# Altium PCB NB3000XN.PcbDoc (part 69 of 71)
Units mil, origin at the board's own origin, x right, y up, seen from the top; angles counter-clockwise.
Board outline 9527.56 x 6929.77 mil, 6 copper layers (Top Layer, GND+SHIELD, MidLayer1, MidLayer2, P2 - 3V3+5V0, Bottom Layer), stack 62.375 mil thick; 832 components, 1027 nets, 4655 pads, 4981 vias.
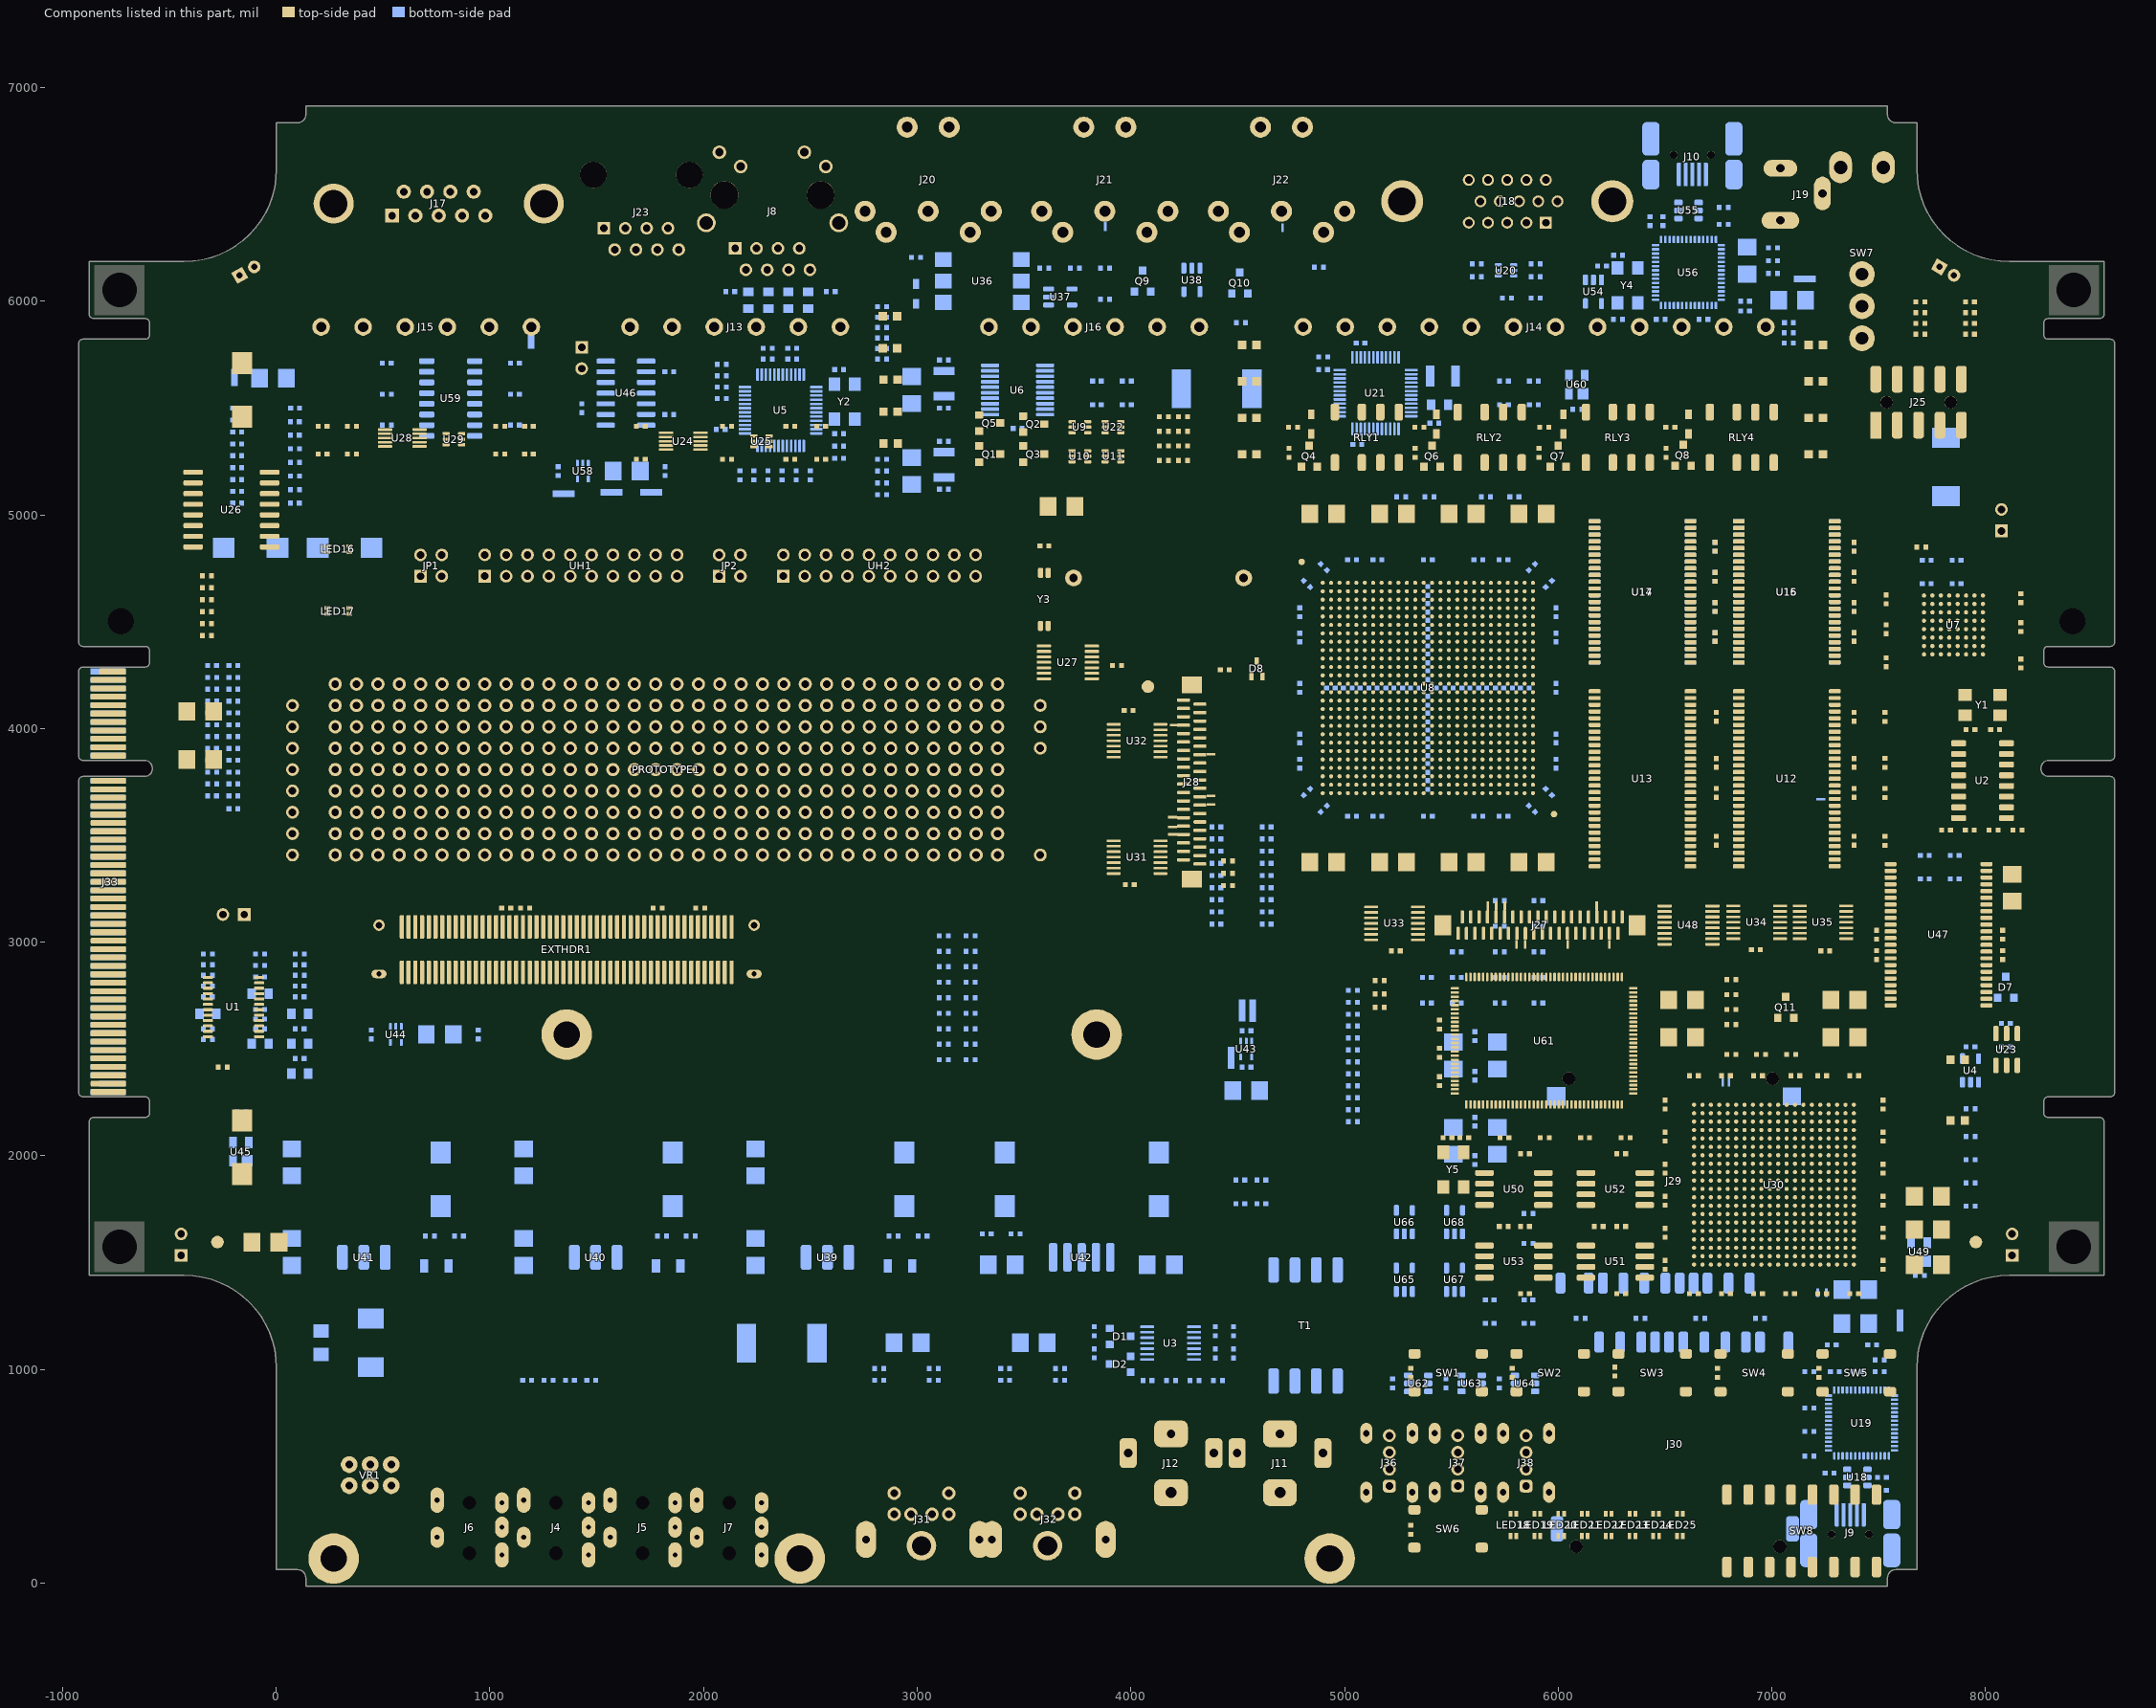
[diagram p73: the components of this part, seen from the top]

## Via types
v1: diameter 23, hole 11.81, Top Layer to Bottom Layer, 3672 vias
v2: diameter 26, hole 11.81, Top Layer to Bottom Layer, 461 vias
v3: diameter 19, hole 11.81, Top Layer to Bottom Layer, tented both sides, 396 vias
v4: diameter 23.62, hole 11.81, Top Layer to Bottom Layer, 288 vias
v5: diameter 20, hole 11.81, Top Layer to Bottom Layer, 91 vias
v6: diameter 23, hole 11.81, Top Layer to Bottom Layer, tented both sides, 50 vias
v7: diameter 31, hole 11.81, Top Layer to Bottom Layer, 15 vias
v8: diameter 27.56, hole 11.81, Top Layer to Bottom Layer, tented both sides, 4 vias
v9: diameter 29, hole 11.81, Top Layer to Bottom Layer, 3 vias
v10: diameter 21, hole 11.81, Top Layer to Bottom Layer, 1 vias

## Nets (pads, with @x,y where several pads share a name; then routed paths per layer and width w, separated by ;. In a path a pad name is that pad's centre, name@x,y a point inside that pad or via, vN(x,y) a via of type N, cw(c..) or ccw(c..) an arc to the next point about the centre after c; other vN are vias at no path point) (continued)
copper on no net: (continued)
  Top Layer w8: v2(6773.78,1550.04) 6793.46,1569.72 ; v2@6773.78,1559.04 ccw(c6773.78,1580.77) 6789.14,1565.4 ccw(c6804.51,1550.04) v2@6782.78,1550.04 ; v2(6773.78,1825.63) 6793.46,1845.31 ; v2@6773.78,1834.63 ccw(c6773.78,1856.36) 6789.14,1840.99 ccw(c6804.51,1825.63) v2@6782.78,1825.63 ; 6787.62,1569.72 cw(c6773.52,1569.72) 6783.49,1559.75 cw(c6793.46,1549.78) 6793.46,1563.88 ; 6787.62,1845.31 cw(c6773.52,1845.31) 6783.49,1835.34 cw(c6793.46,1825.37) 6793.46,1839.47 ; v2(6813.15,1471.3) 6832.83,1490.98 ; v2@6813.15,1480.3 ccw(c6813.15,1502.03) 6828.51,1486.66 ccw(c6843.88,1471.3) v2@6822.15,1471.3 ; v2(6813.15,1510.67) 6832.83,1530.35 ; v2@6813.15,1519.67 ccw(c6813.15,1541.4) 6828.51,1526.03 ccw(c6843.88,1510.67) v2@6822.15,1510.67 ; v2(6813.15,1550.04) 6832.83,1569.72 ; v2@6813.15,1559.04 ccw(c6813.15,1580.77) 6828.51,1565.4 ccw(c6843.88,1550.04) v2@6822.15,1550.04 ; v2(6813.15,1589.41) 6832.83,1609.09 ; v2@6813.15,1598.41 ccw(c6813.15,1620.14) 6828.51,1604.77 ccw(c6843.88,1589.41) v2@6822.15,1589.41 ; v2(6813.15,1628.78) 6832.83,1648.46 ; v2@6813.15,1637.78 ccw(c6813.15,1659.51) 6828.51,1644.14 ccw(c6843.88,1628.78) v2@6822.15,1628.78 ; v2(6813.15,1707.52) 6832.83,1727.2 ; v2@6813.15,1716.52 ccw(c6813.15,1738.25) 6828.51,1722.88 ccw(c6843.88,1707.52) v2@6822.15,1707.52 ; v2@6813.15,1895.37 cw(c6813.15,1873.64) 6828.51,1889.01 cw(c6843.88,1904.37) v2@6822.15,1904.37 ; v2(6813.15,1904.37) 6832.83,1884.68 ; v2@6813.15,1974.11 cw(c6813.15,1952.38) 6828.51,1967.75 cw(c6843.88,1983.11) v2@6822.15,1983.11 ; v2(6813.15,1983.11) 6832.83,1963.43 ; 6826.99,1490.98 cw(c6812.89,1490.98) 6822.86,1481.01 cw(c6832.83,1471.04) 6832.83,1485.14 ; 6826.99,1530.35 cw(c6812.89,1530.35) 6822.86,1520.38 cw(c6832.83,1510.41) 6832.83,1524.51 ; 6826.99,1569.72 cw(c6812.89,1569.72) 6822.86,1559.75 cw(c6832.83,1549.78) 6832.83,1563.88 ; 6826.99,1609.09 cw(c6812.89,1609.09) 6822.86,1599.12 cw(c6832.83,1589.15) 6832.83,1603.25 ; 6826.99,1648.46 cw(c6812.89,1648.46) 6822.86,1638.49 cw(c6832.83,1628.52) 6832.83,1642.62 ; 6826.99,1727.2 cw(c6812.89,1727.2) 6822.86,1717.23 cw(c6832.83,1707.26) 6832.83,1721.36 ; 6826.99,1884.68 ccw(c6812.89,1884.68) 6822.86,1894.66 ccw(c6832.83,1904.63) 6832.83,1890.53 ; 6826.99,1963.43 ccw(c6812.89,1963.43) 6822.86,1973.4 ccw(c6832.83,1983.37) 6832.83,1969.27 ; v2(6852.52,1550.04) 6872.2,1569.72 ; v2@6852.52,1559.04 ccw(c6852.52,1580.77) 6867.88,1565.4 ccw(c6883.25,1550.04) v2@6861.52,1550.04 ; v2(6852.52,1589.41) 6872.2,1609.09 ; v2@6852.52,1598.41 ccw(c6852.52,1620.14) 6867.88,1604.77 ccw(c6883.25,1589.41) v2@6861.52,1589.41 ; v2(6852.52,1628.78) 6872.2,1648.46 ; v2@6852.52,1637.78 ccw(c6852.52,1659.51) 6867.88,1644.14 ccw(c6883.25,1628.78) v2@6861.52,1628.78 ; v2(6852.52,1668.15) 6872.2,1687.83 ; v2@6852.52,1677.15 ccw(c6852.52,1698.88) 6867.88,1683.51 ccw(c6883.25,1668.15) v2@6861.52,1668.15 ; v2(6852.52,1707.52) 6872.2,1727.2 ; v2@6852.52,1716.52 ccw(c6852.52,1738.25) 6867.88,1722.88 ccw(c6883.25,1707.52) v2@6861.52,1707.52 ; v2(6852.52,1746.89) 6872.2,1766.57 ; v2@6852.52,1755.89 ccw(c6852.52,1777.62) 6867.88,1762.25 ccw(c6883.25,1746.89) v2@6861.52,1746.89 ; v2(6852.52,1786.26) 6872.2,1805.94 ; v2@6852.52,1795.26 ccw(c6852.52,1816.99) 6867.88,1801.62 ccw(c6883.25,1786.26) v2@6861.52,1786.26 ; v2(6852.52,1825.63) 6872.2,1845.31 ; v2@6852.52,1834.63 ccw(c6852.52,1856.36) 6867.88,1840.99 ccw(c6883.25,1825.63) v2@6861.52,1825.63 ; v2@6852.52,1895.37 cw(c6852.52,1873.64) 6867.88,1889.01 cw(c6883.25,1904.37) v2@6861.52,1904.37 ; v2(6852.52,1904.37) 6872.2,1884.68 ; v2@6852.52,1934.74 cw(c6852.52,1913.01) 6867.88,1928.38 cw(c6883.25,1943.74) v2@6861.52,1943.74 ; v2(6852.52,1943.74) 6872.2,1924.06 ; v2@6852.52,1974.11 cw(c6852.52,1952.38) 6867.88,1967.75 cw(c6883.25,1983.11) v2@6861.52,1983.11 ; v2(6852.52,1983.11) 6872.2,1963.43 ; v2@6852.52,2013.48 cw(c6852.52,1991.75) 6867.88,2007.12 cw(c6883.25,2022.48) v2@6861.52,2022.48 ; v2(6852.52,2022.48) 6872.2,2002.8 ; v2@6852.52,2052.85 cw(c6852.52,2031.12) 6867.88,2046.49 cw(c6883.25,2061.85) v2@6861.52,2061.85 ; v2(6852.52,2061.85) 6872.2,2042.17 ; v2@6852.52,2092.22 cw(c6852.52,2070.49) 6867.88,2085.86 cw(c6883.25,2101.22) v2@6861.52,2101.22 ; v2(6852.52,2101.22) 6872.2,2081.54 ; 6866.36,1569.72 cw(c6852.26,1569.72) 6862.23,1559.75 cw(c6872.2,1549.78) 6872.2,1563.88 ; 6866.36,1609.09 cw(c6852.26,1609.09) 6862.23,1599.12 cw(c6872.2,1589.15) 6872.2,1603.25 ; 6866.36,1648.46 cw(c6852.26,1648.46) 6862.23,1638.49 cw(c6872.2,1628.52) 6872.2,1642.62 ; 6866.36,1687.83 cw(c6852.26,1687.83) 6862.23,1677.86 cw(c6872.2,1667.89) 6872.2,1681.99 ; 6866.36,1727.2 cw(c6852.26,1727.2) 6862.23,1717.23 cw(c6872.2,1707.26) 6872.2,1721.36 ; 6866.36,1766.57 cw(c6852.26,1766.57) 6862.23,1756.6 cw(c6872.2,1746.63) 6872.2,1760.73 ; 6866.36,1805.94 cw(c6852.26,1805.94) 6862.23,1795.97 cw(c6872.2,1786) 6872.2,1800.1 ; 6866.36,1845.31 cw(c6852.26,1845.31) 6862.23,1835.34 cw(c6872.2,1825.37) 6872.2,1839.47 ; 6866.36,1884.68 ccw(c6852.26,1884.68) 6862.23,1894.66 ccw(c6872.2,1904.63) 6872.2,1890.53 ; 6866.36,1924.06 ccw(c6852.26,1924.06) 6862.23,1934.03 ccw(c6872.2,1944) 6872.2,1929.9 ; 6866.36,1963.43 ccw(c6852.26,1963.43) 6862.23,1973.4 ccw(c6872.2,1983.37) 6872.2,1969.27 ; 6866.36,2002.8 ccw(c6852.26,2002.8) 6862.23,2012.77 ccw(c6872.2,2022.74) 6872.2,2008.64 ; 6866.36,2042.17 ccw(c6852.26,2042.17) 6862.23,2052.14 ccw(c6872.2,2062.11) 6872.2,2048.01 ; 6866.36,2081.54 ccw(c6852.26,2081.54) 6862.23,2091.51 ccw(c6872.2,2101.48) 6872.2,2087.38 ; v2(6891.89,1510.67) 6911.57,1530.35 ; v2@6891.89,1519.67 ccw(c6891.89,1541.4) 6907.25,1526.03 ccw(c6922.62,1510.67) v2@6900.89,1510.67 ; v2(6891.89,1550.04) 6911.57,1569.72 ; v2@6891.89,1559.04 ccw(c6891.89,1580.77) 6907.25,1565.4 ccw(c6922.62,1550.04) v2@6900.89,1550.04 ; v2(6891.89,1589.41) 6911.57,1609.09 ; v2@6891.89,1598.41 ccw(c6891.89,1620.14) 6907.25,1604.77 ccw(c6922.62,1589.41) v2@6900.89,1589.41 ; v2(6891.89,1668.15) 6911.57,1687.83 ; v2@6891.89,1677.15 ccw(c6891.89,1698.88) 6907.25,1683.51 ccw(c6922.62,1668.15) v2@6900.89,1668.15 ; v2(6891.89,1707.52) 6911.57,1727.2 ; v2@6891.89,1716.52 ccw(c6891.89,1738.25) 6907.25,1722.88 ccw(c6922.62,1707.52) v2@6900.89,1707.52 ; v2(6891.89,1786.26) 6911.57,1805.94 ; v2@6891.89,1795.26 ccw(c6891.89,1816.99) 6907.25,1801.62 ccw(c6922.62,1786.26) v2@6900.89,1786.26 ; v2@6891.89,1934.74 cw(c6891.89,1913.01) 6907.25,1928.38 cw(c6922.62,1943.74) v2@6900.89,1943.74 ; v2(6891.89,1943.74) 6911.57,1924.06 ; v2@6891.89,2013.48 cw(c6891.89,1991.75) 6907.25,2007.12 cw(c6922.62,2022.48) v2@6900.89,2022.48 ; v2(6891.89,2022.48) 6911.57,2002.8 ; v2@6891.89,2052.85 cw(c6891.89,2031.12) 6907.25,2046.49 cw(c6922.62,2061.85) v2@6900.89,2061.85 ; v2(6891.89,2061.85) 6911.57,2042.17 ; 6905.73,1530.35 cw(c6891.63,1530.35) 6901.6,1520.38 cw(c6911.57,1510.41) 6911.57,1524.51 ; 6905.73,1569.72 cw(c6891.63,1569.72) 6901.6,1559.75 cw(c6911.57,1549.78) 6911.57,1563.88 ; 6905.73,1609.09 cw(c6891.63,1609.09) 6901.6,1599.12 cw(c6911.57,1589.15) 6911.57,1603.25 ; 6905.73,1687.83 cw(c6891.63,1687.83) 6901.6,1677.86 cw(c6911.57,1667.89) 6911.57,1681.99 ; 6905.73,1727.2 cw(c6891.63,1727.2) 6901.6,1717.23 cw(c6911.57,1707.26) 6911.57,1721.36 ; 6905.73,1805.94 cw(c6891.63,1805.94) 6901.6,1795.97 cw(c6911.57,1786) 6911.57,1800.1 ; 6905.73,1924.06 ccw(c6891.63,1924.06) 6901.6,1934.03 ccw(c6911.57,1944) 6911.57,1929.9 ; 6905.73,2002.8 ccw(c6891.63,2002.8) 6901.6,2012.77 ccw(c6911.57,2022.74) 6911.57,2008.64 ; 6905.73,2042.17 ccw(c6891.63,2042.17) 6901.6,2052.14 ccw(c6911.57,2062.11) 6911.57,2048.01 ; v2(6931.26,1471.3) 6950.94,1490.98 ; v2@6931.26,1480.3 ccw(c6931.26,1502.03) 6946.62,1486.66 ccw(c6961.99,1471.3) v2@6940.26,1471.3 ; v2(6931.26,1510.67) 6950.94,1530.35 ; v2@6931.26,1519.67 ccw(c6931.26,1541.4) 6946.62,1526.03 ccw(c6961.99,1510.67) v2@6940.26,1510.67 ; v2(6931.26,1550.04) 6950.94,1569.72 ; v2@6931.26,1559.04 ccw(c6931.26,1580.77) 6946.62,1565.4 ccw(c6961.99,1550.04) v2@6940.26,1550.04 ; v2(6931.26,1589.41) 6950.94,1609.09 ; v2@6931.26,1598.41 ccw(c6931.26,1620.14) 6946.62,1604.77 ccw(c6961.99,1589.41) v2@6940.26,1589.41 ; v2(6931.26,1628.78) 6950.94,1648.46 ; v2@6931.26,1637.78 ccw(c6931.26,1659.51) 6946.62,1644.14 ccw(c6961.99,1628.78) v2@6940.26,1628.78 ; v2(6931.26,1668.15) 6950.94,1687.83 ; v2@6931.26,1677.15 ccw(c6931.26,1698.88) 6946.62,1683.51 ccw(c6961.99,1668.15) v2@6940.26,1668.15 ; v2(6931.26,1707.52) 6950.94,1727.2 ; v2@6931.26,1716.52 ccw(c6931.26,1738.25) 6946.62,1722.88 ccw(c6961.99,1707.52) v2@6940.26,1707.52 ; v2(6931.26,1746.89) 6950.94,1766.57 ; v2@6931.26,1755.89 ccw(c6931.26,1777.62) 6946.62,1762.25 ccw(c6961.99,1746.89) v2@6940.26,1746.89 ; v2@6931.26,1974.11 cw(c6931.26,1952.38) 6946.62,1967.75 cw(c6961.99,1983.11) v2@6940.26,1983.11 ; v2(6931.26,1983.11) 6950.94,1963.43 ; v2@6931.26,2013.48 cw(c6931.26,1991.75) 6946.62,2007.12 cw(c6961.99,2022.48) v2@6940.26,2022.48 ; v2(6931.26,2022.48) 6950.94,2002.8 ; v2@6931.26,2052.85 cw(c6931.26,2031.12) 6946.62,2046.49 cw(c6961.99,2061.85) v2@6940.26,2061.85 ; v2(6931.26,2061.85) 6950.94,2042.17 ; 6945.1,1490.98 cw(c6931,1490.98) 6940.97,1481.01 cw(c6950.94,1471.04) 6950.94,1485.14 ; 6945.1,1530.35 cw(c6931,1530.35) 6940.97,1520.38 cw(c6950.94,1510.41) 6950.94,1524.51 ; 6945.1,1569.72 cw(c6931,1569.72) 6940.97,1559.75 cw(c6950.94,1549.78) 6950.94,1563.88 ; 6945.1,1609.09 cw(c6931,1609.09) 6940.97,1599.12 cw(c6950.94,1589.15) 6950.94,1603.25 ; 6945.1,1648.46 cw(c6931,1648.46) 6940.97,1638.49 cw(c6950.94,1628.52) 6950.94,1642.62 ; 6945.1,1687.83 cw(c6931,1687.83) 6940.97,1677.86 cw(c6950.94,1667.89) 6950.94,1681.99 ; 6945.1,1727.2 cw(c6931,1727.2) 6940.97,1717.23 cw(c6950.94,1707.26) 6950.94,1721.36 ; 6945.1,1766.57 cw(c6931,1766.57) 6940.97,1756.6 cw(c6950.94,1746.63) 6950.94,1760.73 ; 6945.1,1963.43 ccw(c6931,1963.43) 6940.97,1973.4 ccw(c6950.94,1983.37) 6950.94,1969.27 ; 6945.1,2002.8 ccw(c6931,2002.8) 6940.97,2012.77 ccw(c6950.94,2022.74) 6950.94,2008.64 ; 6945.1,2042.17 ccw(c6931,2042.17) 6940.97,2052.14 ccw(c6950.94,2062.11) 6950.94,2048.01 ; v2(6970.63,1510.67) 6990.31,1530.35 ; v2@6970.63,1519.67 ccw(c6970.63,1541.4) 6985.99,1526.03 ccw(c7001.36,1510.67) v2@6979.63,1510.67 ; v2(6970.63,1550.04) 6990.31,1569.72 ; v2@6970.63,1559.04 ccw(c6970.63,1580.77) 6985.99,1565.4 ccw(c7001.36,1550.04) v2@6979.63,1550.04 ; v2(6970.63,1589.41) 6990.31,1609.09 ; v2@6970.63,1598.41 ccw(c6970.63,1620.14) 6985.99,1604.77 ccw(c7001.36,1589.41) v2@6979.63,1589.41 ; v2(6970.63,1628.78) 6990.31,1648.46 ; v2@6970.63,1637.78 ccw(c6970.63,1659.51) 6985.99,1644.14 ccw(c7001.36,1628.78) v2@6979.63,1628.78 ; v2(6970.63,1668.15) 6990.31,1687.83 ; v2@6970.63,1677.15 ccw(c6970.63,1698.88) 6985.99,1683.51 ccw(c7001.36,1668.15) v2@6979.63,1668.15 ; v2(6970.63,1707.52) 6990.31,1727.2 ; v2@6970.63,1716.52 ccw(c6970.63,1738.25) 6985.99,1722.88 ccw(c7001.36,1707.52) v2@6979.63,1707.52 ; v2(6970.63,1746.89) 6990.31,1766.57 ; v2@6970.63,1755.89 ccw(c6970.63,1777.62) 6985.99,1762.25 ccw(c7001.36,1746.89) v2@6979.63,1746.89 ; v2@6970.63,2013.48 cw(c6970.63,1991.75) 6985.99,2007.12 cw(c7001.36,2022.48) v2@6979.63,2022.48 ; v2(6970.63,2022.48) 6990.31,2002.8 ; v2@6970.63,2052.85 cw(c6970.63,2031.12) 6985.99,2046.49 cw(c7001.36,2061.85) v2@6979.63,2061.85 ; v2(6970.63,2061.85) 6990.31,2042.17 ; 6984.47,1530.35 cw(c6970.37,1530.35) 6980.34,1520.38 cw(c6990.31,1510.41) 6990.31,1524.51 ; 6984.47,1569.72 cw(c6970.37,1569.72) 6980.34,1559.75 cw(c6990.31,1549.78) 6990.31,1563.88 ; 6984.47,1609.09 cw(c6970.37,1609.09) 6980.34,1599.12 cw(c6990.31,1589.15) 6990.31,1603.25 ; 6984.47,1648.46 cw(c6970.37,1648.46) 6980.34,1638.49 cw(c6990.31,1628.52) 6990.31,1642.62 ; 6984.47,1687.83 cw(c6970.37,1687.83) 6980.34,1677.86 cw(c6990.31,1667.89) 6990.31,1681.99 ; 6984.47,1727.2 cw(c6970.37,1727.2) 6980.34,1717.23 cw(c6990.31,1707.26) 6990.31,1721.36 ; 6984.47,1766.57 cw(c6970.37,1766.57) 6980.34,1756.6 cw(c6990.31,1746.63) 6990.31,1760.73 ; 6984.47,2002.8 ccw(c6970.37,2002.8) 6980.34,2012.77 ccw(c6990.31,2022.74) 6990.31,2008.64 ; 6984.47,2042.17 ccw(c6970.37,2042.17) 6980.34,2052.14 ccw(c6990.31,2062.11) 6990.31,2048.01 ; 7029.69,1485.14 cw(c7029.69,1471.04) 7039.66,1481.01 cw(c7049.63,1490.98) 7035.53,1490.98 ; 7029.69,1490.98 v2(7049.37,1471.3) ; 7029.69,1563.88 cw(c7029.69,1549.78) 7039.66,1559.75 cw(c7049.63,1569.72) 7035.53,1569.72 ; 7029.69,1569.72 v2(7049.37,1550.04) ; 7029.69,1642.62 cw(c7029.69,1628.52) 7039.66,1638.49 cw(c7049.63,1648.46) 7035.53,1648.46 ; 7029.69,1648.46 v2(7049.37,1628.78) ; 7029.69,1681.99 cw(c7029.69,1667.89) 7039.66,1677.86 cw(c7049.63,1687.83) 7035.53,1687.83 ; 7029.69,1687.83 v2(7049.37,1668.15) ; 7029.69,1721.36 cw(c7029.69,1707.26) 7039.66,1717.23 cw(c7049.63,1727.2) 7035.53,1727.2 ; 7029.69,1727.2 v2(7049.37,1707.52) ; 7029.69,1963.43 v2(7049.37,1983.11) ; 7029.69,1969.27 ccw(c7029.69,1983.37) 7039.66,1973.4 ccw(c7049.63,1963.43) 7035.53,1963.43 ; 7029.69,2002.8 v2(7049.37,2022.48) ; 7029.69,2008.64 ccw(c7029.69,2022.74) 7039.66,2012.77 ccw(c7049.63,2002.8) 7035.53,2002.8 ; 7029.69,2042.17 v2(7049.37,2061.85) ; 7029.69,2048.01 ccw(c7029.69,2062.11) 7039.66,2052.14 ccw(c7049.63,2042.17) 7035.53,2042.17 ; 7029.69,2081.54 v2(7049.37,2101.22) ; 7029.69,2087.38 ccw(c7029.69,2101.48) 7039.66,2091.51 ccw(c7049.63,2081.54) 7035.53,2081.54 ; v2@7040.37,1471.3 ccw(c7018.64,1471.3) 7034.01,1486.66 ccw(c7049.37,1502.03) v2@7049.37,1480.3 ; v2@7040.37,1550.04 ccw(c7018.64,1550.04) 7034.01,1565.4 ccw(c7049.37,1580.77) v2@7049.37,1559.04 ; v2@7040.37,1628.78 ccw(c7018.64,1628.78) 7034.01,1644.14 ccw(c7049.37,1659.51) v2@7049.37,1637.78 ; v2@7040.37,1668.15 ccw(c7018.64,1668.15) 7034.01,1683.51 ccw(c7049.37,1698.88) v2@7049.37,1677.15 ; v2@7040.37,1707.52 ccw(c7018.64,1707.52) 7034.01,1722.88 ccw(c7049.37,1738.25) v2@7049.37,1716.52 ; v2@7040.37,1983.11 cw(c7018.64,1983.11) 7034.01,1967.75 cw(c7049.37,1952.38) v2@7049.37,1974.11 ; v2@7040.37,2022.48 cw(c7018.64,2022.48) 7034.01,2007.12 cw(c7049.37,1991.75) v2@7049.37,2013.48 ; v2@7040.37,2061.85 cw(c7018.64,2061.85) 7034.01,2046.49 cw(c7049.37,2031.12) v2@7049.37,2052.85 ; v2@7040.37,2101.22 cw(c7018.64,2101.22) 7034.01,2085.86 cw(c7049.37,2070.49) v2@7049.37,2092.22 ; 7069.06,1485.14 cw(c7069.06,1471.04) 7079.03,1481.01 cw(c7089,1490.98) 7074.9,1490.98 ; 7069.06,1490.98 v2(7088.74,1471.3) ; 7069.06,1524.51 cw(c7069.06,1510.41) 7079.03,1520.38 cw(c7089,1530.35) 7074.9,1530.35 ; 7069.06,1530.35 v2(7088.74,1510.67) ; 7069.06,1563.88 cw(c7069.06,1549.78) 7079.03,1559.75 cw(c7089,1569.72) 7074.9,1569.72 ; 7069.06,1569.72 v2(7088.74,1550.04) ; 7069.06,1603.25 cw(c7069.06,1589.15) 7079.03,1599.12 cw(c7089,1609.09) 7074.9,1609.09 ; 7069.06,1609.09 v2(7088.74,1589.41) ; 7069.06,1642.62 cw(c7069.06,1628.52) 7079.03,1638.49 cw(c7089,1648.46) 7074.9,1648.46 ; 7069.06,1648.46 v2(7088.74,1628.78) ; 7069.06,1681.99 cw(c7069.06,1667.89) 7079.03,1677.86 cw(c7089,1687.83) 7074.9,1687.83 ; 7069.06,1687.83 v2(7088.74,1668.15) ; 7069.06,1721.36 cw(c7069.06,1707.26) 7079.03,1717.23 cw(c7089,1727.2) 7074.9,1727.2 ; 7069.06,1727.2 v2(7088.74,1707.52) ; 7069.06,1760.73 cw(c7069.06,1746.63) 7079.03,1756.6 cw(c7089,1766.57) 7074.9,1766.57 ; 7069.06,1766.57 v2(7088.74,1746.89) ; 7069.06,1963.43 v2(7088.74,1983.11) ; 7069.06,1969.27 ccw(c7069.06,1983.37) 7079.03,1973.4 ccw(c7089,1963.43) 7074.9,1963.43 ; 7069.06,2002.8 v2(7088.74,2022.48) ; 7069.06,2008.64 ccw(c7069.06,2022.74) 7079.03,2012.77 ccw(c7089,2002.8) 7074.9,2002.8 ; v2@7079.74,1471.3 ccw(c7058.01,1471.3) 7073.38,1486.66 ccw(c7088.74,1502.03) v2@7088.74,1480.3 ; v2@7079.74,1510.67 ccw(c7058.01,1510.67) 7073.38,1526.03 ccw(c7088.74,1541.4) v2@7088.74,1519.67 ; v2@7079.74,1550.04 ccw(c7058.01,1550.04) 7073.38,1565.4 ccw(c7088.74,1580.77) v2@7088.74,1559.04 ; v2@7079.74,1589.41 ccw(c7058.01,1589.41) 7073.38,1604.77 ccw(c7088.74,1620.14) v2@7088.74,1598.41 ; v2@7079.74,1628.78 ccw(c7058.01,1628.78) 7073.38,1644.14 ccw(c7088.74,1659.51) v2@7088.74,1637.78 ; v2@7079.74,1668.15 ccw(c7058.01,1668.15) 7073.38,1683.51 ccw(c7088.74,1698.88) v2@7088.74,1677.15 ; v2@7079.74,1707.52 ccw(c7058.01,1707.52) 7073.38,1722.88 ccw(c7088.74,1738.25) v2@7088.74,1716.52 ; v2@7079.74,1746.89 ccw(c7058.01,1746.89) 7073.38,1762.25 ccw(c7088.74,1777.62) v2@7088.74,1755.89 ; v2@7079.74,1983.11 cw(c7058.01,1983.11) 7073.38,1967.75 cw(c7088.74,1952.38) v2@7088.74,1974.11 ; v2@7079.74,2022.48 cw(c7058.01,2022.48) 7073.38,2007.12 cw(c7088.74,1991.75) v2@7088.74,2013.48 ; 7108.43,1485.14 cw(c7108.43,1471.04) 7118.4,1481.01 cw(c7128.37,1490.98) 7114.27,1490.98 ; 7108.43,1490.98 v2(7128.11,1471.3) ; 7108.43,1524.51 cw(c7108.43,1510.41) 7118.4,1520.38 cw(c7128.37,1530.35) 7114.27,1530.35 ; 7108.43,1530.35 v2(7128.11,1510.67) ; 7108.43,1563.88 cw(c7108.43,1549.78) 7118.4,1559.75 cw(c7128.37,1569.72) 7114.27,1569.72 ; 7108.43,1569.72 v2(7128.11,1550.04) ; 7108.43,1603.25 cw(c7108.43,1589.15) 7118.4,1599.12 cw(c7128.37,1609.09) 7114.27,1609.09 ; 7108.43,1609.09 v2(7128.11,1589.41) ; 7108.43,1681.99 cw(c7108.43,1667.89) 7118.4,1677.86 cw(c7128.37,1687.83) 7114.27,1687.83 ; 7108.43,1687.83 v2(7128.11,1668.15) ; 7108.43,1721.36 cw(c7108.43,1707.26) 7118.4,1717.23 cw(c7128.37,1727.2) 7114.27,1727.2 ; 7108.43,1727.2 v2(7128.11,1707.52) ; 7108.43,1800.1 cw(c7108.43,1786) 7118.4,1795.97 cw(c7128.37,1805.94) 7114.27,1805.94 ; 7108.43,1805.94 v2(7128.11,1786.26) ; 7108.43,1839.47 cw(c7108.43,1825.37) 7118.4,1835.34 cw(c7128.37,1845.31) 7114.27,1845.31 ; 7108.43,1845.31 v2(7128.11,1825.63) ; 7108.43,1884.68 v2(7128.11,1904.37) ; 7108.43,1890.53 ccw(c7108.43,1904.63) 7118.4,1894.66 ccw(c7128.37,1884.68) 7114.27,1884.68 ; 7108.43,1924.06 v2(7128.11,1943.74) ; 7108.43,1929.9 ccw(c7108.43,1944) 7118.4,1934.03 ccw(c7128.37,1924.06) 7114.27,1924.06 ; 7108.43,2002.8 v2(7128.11,2022.48) ; 7108.43,2008.64 ccw(c7108.43,2022.74) 7118.4,2012.77 ccw(c7128.37,2002.8) 7114.27,2002.8 ; v2@7119.11,1471.3 ccw(c7097.38,1471.3) 7112.75,1486.66 ccw(c7128.11,1502.03) v2@7128.11,1480.3 ; v2@7119.11,1510.67 ccw(c7097.38,1510.67) 7112.75,1526.03 ccw(c7128.11,1541.4) v2@7128.11,1519.67 ; v2@7119.11,1550.04 ccw(c7097.38,1550.04) 7112.75,1565.4 ccw(c7128.11,1580.77) v2@7128.11,1559.04 ; v2@7119.11,1589.41 ccw(c7097.38,1589.41) 7112.75,1604.77 ccw(c7128.11,1620.14) v2@7128.11,1598.41 ; v2@7119.11,1668.15 ccw(c7097.38,1668.15) 7112.75,1683.51 ccw(c7128.11,1698.88) v2@7128.11,1677.15 ; v2@7119.11,1707.52 ccw(c7097.38,1707.52) 7112.75,1722.88 ccw(c7128.11,1738.25) v2@7128.11,1716.52 ; v2@7119.11,1786.26 ccw(c7097.38,1786.26) 7112.75,1801.62 ccw(c7128.11,1816.99) v2@7128.11,1795.26 ; v2@7119.11,1825.63 ccw(c7097.38,1825.63) 7112.75,1840.99 ccw(c7128.11,1856.36) v2@7128.11,1834.63 ; v2@7119.11,1904.37 cw(c7097.38,1904.37) 7112.75,1889.01 cw(c7128.11,1873.64) v2@7128.11,1895.37 ; v2@7119.11,1943.74 cw(c7097.38,1943.74) 7112.75,1928.38 cw(c7128.11,1913.01) v2@7128.11,1934.74 ; v2@7119.11,2022.48 cw(c7097.38,2022.48) 7112.75,2007.12 cw(c7128.11,1991.75) v2@7128.11,2013.48 ; 7147.8,1485.14 cw(c7147.8,1471.04) 7157.77,1481.01 cw(c7167.74,1490.98) 7153.64,1490.98 ; 7147.8,1490.98 v2(7167.48,1471.3) ; 7147.8,1563.88 cw(c7147.8,1549.78) 7157.77,1559.75 cw(c7167.74,1569.72) 7153.64,1569.72 ; 7147.8,1569.72 v2(7167.48,1550.04) ; 7147.8,1603.25 cw(c7147.8,1589.15) 7157.77,1599.12 cw(c7167.74,1609.09) 7153.64,1609.09 ; 7147.8,1609.09 v2(7167.48,1589.41) ; 7147.8,1642.62 cw(c7147.8,1628.52) 7157.77,1638.49 cw(c7167.74,1648.46) 7153.64,1648.46 ; 7147.8,1648.46 v2(7167.48,1628.78) ; 7147.8,1681.99 cw(c7147.8,1667.89) 7157.77,1677.86 cw(c7167.74,1687.83) 7153.64,1687.83 ; 7147.8,1687.83 v2(7167.48,1668.15) ; 7147.8,1721.36 cw(c7147.8,1707.26) 7157.77,1717.23 cw(c7167.74,1727.2) 7153.64,1727.2 ; 7147.8,1727.2 v2(7167.48,1707.52) ; 7147.8,1760.73 cw(c7147.8,1746.63) 7157.77,1756.6 cw(c7167.74,1766.57) 7153.64,1766.57 ; 7147.8,1766.57 v2(7167.48,1746.89) ; 7147.8,1800.1 cw(c7147.8,1786) 7157.77,1795.97 cw(c7167.74,1805.94) 7153.64,1805.94 ; 7147.8,1805.94 v2(7167.48,1786.26) ; 7147.8,1839.47 cw(c7147.8,1825.37) 7157.77,1835.34 cw(c7167.74,1845.31) 7153.64,1845.31 ; 7147.8,1845.31 v2(7167.48,1825.63) ; 7147.8,1884.68 v2(7167.48,1904.37) ; 7147.8,1890.53 ccw(c7147.8,1904.63) 7157.77,1894.66 ccw(c7167.74,1884.68) 7153.64,1884.68 ; 7147.8,1924.06 v2(7167.48,1943.74) ; 7147.8,1929.9 ccw(c7147.8,1944) 7157.77,1934.03 ccw(c7167.74,1924.06) 7153.64,1924.06 ; 7147.8,1963.43 v2(7167.48,1983.11) ; 7147.8,1969.27 ccw(c7147.8,1983.37) 7157.77,1973.4 ccw(c7167.74,1963.43) 7153.64,1963.43 ; 7147.8,2002.8 v2(7167.48,2022.48) ; 7147.8,2008.64 ccw(c7147.8,2022.74) 7157.77,2012.77 ccw(c7167.74,2002.8) 7153.64,2002.8 ; 7147.8,2042.17 v2(7167.48,2061.85) ; 7147.8,2048.01 ccw(c7147.8,2062.11) 7157.77,2052.14 ccw(c7167.74,2042.17) 7153.64,2042.17 ; v2@7158.48,1471.3 ccw(c7136.75,1471.3) 7152.12,1486.66 ccw(c7167.48,1502.03) v2@7167.48,1480.3 ; v2@7158.48,1550.04 ccw(c7136.75,1550.04) 7152.12,1565.4 ccw(c7167.48,1580.77) v2@7167.48,1559.04 ; v2@7158.48,1589.41 ccw(c7136.75,1589.41) 7152.12,1604.77 ccw(c7167.48,1620.14) v2@7167.48,1598.41 ; v2@7158.48,1628.78 ccw(c7136.75,1628.78) 7152.12,1644.14 ccw(c7167.48,1659.51) v2@7167.48,1637.78 ; v2@7158.48,1668.15 ccw(c7136.75,1668.15) 7152.12,1683.51 ccw(c7167.48,1698.88) v2@7167.48,1677.15 ; v2@7158.48,1707.52 ccw(c7136.75,1707.52) 7152.12,1722.88 ccw(c7167.48,1738.25) v2@7167.48,1716.52 ; v2@7158.48,1746.89 ccw(c7136.75,1746.89) 7152.12,1762.25 ccw(c7167.48,1777.62) v2@7167.48,1755.89 ; v2@7158.48,1786.26 ccw(c7136.75,1786.26) 7152.12,1801.62 ccw(c7167.48,1816.99) v2@7167.48,1795.26 ; v2@7158.48,1825.63 ccw(c7136.75,1825.63) 7152.12,1840.99 ccw(c7167.48,1856.36) v2@7167.48,1834.63 ; v2@7158.48,1904.37 cw(c7136.75,1904.37) 7152.12,1889.01 cw(c7167.48,1873.64) v2@7167.48,1895.37 ; v2@7158.48,1943.74 cw(c7136.75,1943.74) 7152.12,1928.38 cw(c7167.48,1913.01) v2@7167.48,1934.74 ; v2@7158.48,1983.11 cw(c7136.75,1983.11) 7152.12,1967.75 cw(c7167.48,1952.38) v2@7167.48,1974.11 ; v2@7158.48,2022.48 cw(c7136.75,2022.48) 7152.12,2007.12 cw(c7167.48,1991.75) v2@7167.48,2013.48 ; v2@7158.48,2061.85 cw(c7136.75,2061.85) 7152.12,2046.49 cw(c7167.48,2031.12) v2@7167.48,2052.85 ; 7187.17,1524.51 cw(c7187.17,1510.41) 7197.14,1520.38 cw(c7207.11,1530.35) 7193.01,1530.35 ; 7187.17,1530.35 v2(7206.85,1510.67) ; 7187.17,1563.88 cw(c7187.17,1549.78) 7197.14,1559.75 cw(c7207.11,1569.72) 7193.01,1569.72 ; 7187.17,1569.72 v2(7206.85,1550.04) ; 7187.17,1603.25 cw(c7187.17,1589.15) 7197.14,1599.12 cw(c7207.11,1609.09) 7193.01,1609.09 ; 7187.17,1609.09 v2(7206.85,1589.41) ; 7187.17,1642.62 cw(c7187.17,1628.52) 7197.14,1638.49 cw(c7207.11,1648.46) 7193.01,1648.46 ; 7187.17,1648.46 v2(7206.85,1628.78) ; 7187.17,1721.36 cw(c7187.17,1707.26) 7197.14,1717.23 cw(c7207.11,1727.2) 7193.01,1727.2 ; 7187.17,1727.2 v2(7206.85,1707.52) ; 7187.17,1760.73 cw(c7187.17,1746.63) 7197.14,1756.6 cw(c7207.11,1766.57) 7193.01,1766.57 ; 7187.17,1766.57 v2(7206.85,1746.89) ; 7187.17,1800.1 cw(c7187.17,1786) 7197.14,1795.97 cw(c7207.11,1805.94) 7193.01,1805.94 ; 7187.17,1805.94 v2(7206.85,1786.26) ; 7187.17,1839.47 cw(c7187.17,1825.37) 7197.14,1835.34 cw(c7207.11,1845.31) 7193.01,1845.31 ; 7187.17,1845.31 v2(7206.85,1825.63) ; v2@7197.85,1510.67 ccw(c7176.12,1510.67) 7191.49,1526.03 ccw(c7206.85,1541.4) v2@7206.85,1519.67 ; v2@7197.85,1550.04 ccw(c7176.12,1550.04) 7191.49,1565.4 ccw(c7206.85,1580.77) v2@7206.85,1559.04 ; v2@7197.85,1589.41 ccw(c7176.12,1589.41) 7191.49,1604.77 ccw(c7206.85,1620.14) v2@7206.85,1598.41 ; v2@7197.85,1628.78 ccw(c7176.12,1628.78) 7191.49,1644.14 ccw(c7206.85,1659.51) v2@7206.85,1637.78 ; v2@7197.85,1707.52 ccw(c7176.12,1707.52) 7191.49,1722.88 ccw(c7206.85,1738.25) v2@7206.85,1716.52 ; v2@7197.85,1746.89 ccw(c7176.12,1746.89) 7191.49,1762.25 ccw(c7206.85,1777.62) v2@7206.85,1755.89 ; v2@7197.85,1786.26 ccw(c7176.12,1786.26) 7191.49,1801.62 ccw(c7206.85,1816.99) v2@7206.85,1795.26 ; v2@7197.85,1825.63 ccw(c7176.12,1825.63) 7191.49,1840.99 ccw(c7206.85,1856.36) v2@7206.85,1834.63 ; 7226.54,1524.51 cw(c7226.54,1510.41) 7236.51,1520.38 cw(c7246.48,1530.35) 7232.38,1530.35 ; 7226.54,1530.35 v2(7246.22,1510.67) ; 7226.54,1563.88 cw(c7226.54,1549.78) 7236.51,1559.75 cw(c7246.48,1569.72) 7232.38,1569.72 ; 7226.54,1569.72 v2(7246.22,1550.04) ; 7226.54,1681.99 cw(c7226.54,1667.89) 7236.51,1677.86 cw(c7246.48,1687.83) 7232.38,1687.83 ; 7226.54,1687.83 v2(7246.22,1668.15) ; 7226.54,1721.36 cw(c7226.54,1707.26) 7236.51,1717.23 cw(c7246.48,1727.2) 7232.38,1727.2 ; 7226.54,1727.2 v2(7246.22,1707.52) ; 7226.54,1760.73 cw(c7226.54,1746.63) 7236.51,1756.6 cw(c7246.48,1766.57) 7232.38,1766.57 ; 7226.54,1766.57 v2(7246.22,1746.89) ; v2@7237.22,1510.67 ccw(c7215.49,1510.67) 7230.86,1526.03 ccw(c7246.22,1541.4) v2@7246.22,1519.67 ; v2@7237.22,1550.04 ccw(c7215.49,1550.04) 7230.86,1565.4 ccw(c7246.22,1580.77) v2@7246.22,1559.04 ; v2@7237.22,1668.15 ccw(c7215.49,1668.15) 7230.86,1683.51 ccw(c7246.22,1698.88) v2@7246.22,1677.15 ; v2@7237.22,1707.52 ccw(c7215.49,1707.52) 7230.86,1722.88 ccw(c7246.22,1738.25) v2@7246.22,1716.52 ; v2@7237.22,1746.89 ccw(c7215.49,1746.89) 7230.86,1762.25 ccw(c7246.22,1777.62) v2@7246.22,1755.89 ; 7265.91,1485.14 cw(c7265.91,1471.04) 7275.88,1481.01 cw(c7285.85,1490.98) 7271.75,1490.98 ; 7265.91,1490.98 v2(7285.59,1471.3) ; 7265.91,1563.88 cw(c7265.91,1549.78) 7275.88,1559.75 cw(c7285.85,1569.72) 7271.75,1569.72 ; 7265.91,1569.72 v2(7285.59,1550.04) ; 7265.91,1603.25 cw(c7265.91,1589.15) 7275.88,1599.12 cw(c7285.85,1609.09) 7271.75,1609.09 ; 7265.91,1609.09 v2(7285.59,1589.41) ; 7265.91,1642.62 cw(c7265.91,1628.52) 7275.88,1638.49 cw(c7285.85,1648.46) 7271.75,1648.46 ; 7265.91,1648.46 v2(7285.59,1628.78) ; 7265.91,1681.99 cw(c7265.91,1667.89) 7275.88,1677.86 cw(c7285.85,1687.83) 7271.75,1687.83 ; 7265.91,1687.83 v2(7285.59,1668.15) ; 7265.91,1721.36 cw(c7265.91,1707.26) 7275.88,1717.23 cw(c7285.85,1727.2) 7271.75,1727.2 ; 7265.91,1727.2 v2(7285.59,1707.52) ; 7265.91,1800.1 cw(c7265.91,1786) 7275.88,1795.97 cw(c7285.85,1805.94) 7271.75,1805.94 ; 7265.91,1805.94 v2(7285.59,1786.26) ; v2@7276.59,1471.3 ccw(c7254.86,1471.3) 7270.23,1486.66 ccw(c7285.59,1502.03) v2@7285.59,1480.3 ; v2@7276.59,1550.04 ccw(c7254.86,1550.04) 7270.23,1565.4 ccw(c7285.59,1580.77) v2@7285.59,1559.04 ; v2@7276.59,1589.41 ccw(c7254.86,1589.41) 7270.23,1604.77 ccw(c7285.59,1620.14) v2@7285.59,1598.41 ; v2@7276.59,1628.78 ccw(c7254.86,1628.78) 7270.23,1644.14 ccw(c7285.59,1659.51) v2@7285.59,1637.78 ; v2@7276.59,1668.15 ccw(c7254.86,1668.15) 7270.23,1683.51 ccw(c7285.59,1698.88) v2@7285.59,1677.15 ; v2@7276.59,1707.52 ccw(c7254.86,1707.52) 7270.23,1722.88 ccw(c7285.59,1738.25) v2@7285.59,1716.52 ; v2@7276.59,1786.26 ccw(c7254.86,1786.26) 7270.23,1801.62 ccw(c7285.59,1816.99) v2@7285.59,1795.26 ; 7305.28,1485.14 cw(c7305.28,1471.04) 7315.25,1481.01 cw(c7325.22,1490.98) 7311.12,1490.98 ; 7305.28,1490.98 v2(7324.96,1471.3) ; 7305.28,1524.51 cw(c7305.28,1510.41) 7315.25,1520.38 cw(c7325.22,1530.35) 7311.12,1530.35 ; 7305.28,1530.35 v2(7324.96,1510.67) ; 7305.28,1603.25 cw(c7305.28,1589.15) 7315.25,1599.12 cw(c7325.22,1609.09) 7311.12,1609.09 ; 7305.28,1609.09 v2(7324.96,1589.41) ; 7305.28,1642.62 cw(c7305.28,1628.52) 7315.25,1638.49 cw(c7325.22,1648.46) 7311.12,1648.46 ; 7305.28,1648.46 v2(7324.96,1628.78) ; 7305.28,1681.99 cw(c7305.28,1667.89) 7315.25,1677.86 cw(c7325.22,1687.83) 7311.12,1687.83 ; 7305.28,1687.83 v2(7324.96,1668.15) ; 7305.28,1721.36 cw(c7305.28,1707.26) 7315.25,1717.23 cw(c7325.22,1727.2) 7311.12,1727.2 ; 7305.28,1727.2 v2(7324.96,1707.52) ; v2@7315.96,1471.3 ccw(c7294.23,1471.3) 7309.6,1486.66 ccw(c7324.96,1502.03) v2@7324.96,1480.3 ; v2@7315.96,1510.67 ccw(c7294.23,1510.67) 7309.6,1526.03 ccw(c7324.96,1541.4) v2@7324.96,1519.67 ; v2@7315.96,1589.41 ccw(c7294.23,1589.41) 7309.6,1604.77 ccw(c7324.96,1620.14) v2@7324.96,1598.41 ; v2@7315.96,1628.78 ccw(c7294.23,1628.78) 7309.6,1644.14 ccw(c7324.96,1659.51) v2@7324.96,1637.78 ; v2@7315.96,1668.15 ccw(c7294.23,1668.15) 7309.6,1683.51 ccw(c7324.96,1698.88) v2@7324.96,1677.15 ; v2@7315.96,1707.52 ccw(c7294.23,1707.52) 7309.6,1722.88 ccw(c7324.96,1738.25) v2@7324.96,1716.52 ; 7344.65,1485.14 cw(c7344.65,1471.04) 7354.62,1481.01 cw(c7364.59,1490.98) 7350.49,1490.98 ; 7344.65,1490.98 v2(7364.33,1471.3) ; 7344.65,1524.51 cw(c7344.65,1510.41) 7354.62,1520.38 cw(c7364.59,1530.35) 7350.49,1530.35 ; 7344.65,1530.35 v2(7364.33,1510.67) ; 7344.65,1563.88 cw(c7344.65,1549.78) 7354.62,1559.75 cw(c7364.59,1569.72) 7350.49,1569.72 ; 7344.65,1569.72 v2(7364.33,1550.04) ; 7344.65,1603.25 cw(c7344.65,1589.15) 7354.62,1599.12 cw(c7364.59,1609.09) 7350.49,1609.09 ; 7344.65,1609.09 v2(7364.33,1589.41) ; 7344.65,1681.99 cw(c7344.65,1667.89) 7354.62,1677.86 cw(c7364.59,1687.83) 7350.49,1687.83 ; 7344.65,1687.83 v2(7364.33,1668.15) ; v2@7355.33,1471.3 ccw(c7333.6,1471.3) 7348.97,1486.66 ccw(c7364.33,1502.03) v2@7364.33,1480.3 ; v2@7355.33,1510.67 ccw(c7333.6,1510.67) 7348.97,1526.03 ccw(c7364.33,1541.4) v2@7364.33,1519.67 ; v2@7355.33,1550.04 ccw(c7333.6,1550.04) 7348.97,1565.4 ccw(c7364.33,1580.77) v2@7364.33,1559.04 ; v2@7355.33,1589.41 ccw(c7333.6,1589.41) 7348.97,1604.77 ccw(c7364.33,1620.14) v2@7364.33,1598.41 ; v2@7355.33,1668.15 ccw(c7333.6,1668.15) 7348.97,1683.51 ccw(c7364.33,1698.88) v2@7364.33,1677.15 ; 7384.02,1563.88 cw(c7384.02,1549.78) 7393.99,1559.75 cw(c7403.96,1569.72) 7389.86,1569.72 ; 7384.02,1569.72 v2(7403.7,1550.04) ; 7384.02,1603.25 cw(c7384.02,1589.15) 7393.99,1599.12 cw(c7403.96,1609.09) 7389.86,1609.09 ; 7384.02,1609.09 v2(7403.7,1589.41) ; 7384.02,1642.62 cw(c7384.02,1628.52) 7393.99,1638.49 cw(c7403.96,1648.46) 7389.86,1648.46 ; 7384.02,1648.46 v2(7403.7,1628.78) ; 7384.02,1681.99 cw(c7384.02,1667.89) 7393.99,1677.86 cw(c7403.96,1687.83) 7389.86,1687.83 ; 7384.02,1687.83 v2(7403.7,1668.15) ; v2@7394.7,1550.04 ccw(c7372.97,1550.04) 7388.34,1565.4 ccw(c7403.7,1580.77) v2@7403.7,1559.04 ; v2@7394.7,1589.41 ccw(c7372.97,1589.41) 7388.34,1604.77 ccw(c7403.7,1620.14) v2@7403.7,1598.41 ; v2@7394.7,1628.78 ccw(c7372.97,1628.78) 7388.34,1644.14 ccw(c7403.7,1659.51) v2@7403.7,1637.78 ; v2@7394.7,1668.15 ccw(c7372.97,1668.15) 7388.34,1683.51 ccw(c7403.7,1698.88) v2@7403.7,1677.15 ; v2(7692.52,4327.52) 7712.2,4347.2 ; v2@7692.52,4336.52 ccw(c7692.52,4358.25) 7707.88,4342.88 ccw(c7723.25,4327.52) v2@7701.52,4327.52 ; v2@7692.52,4633.48 cw(c7692.52,4611.75) 7707.88,4627.12 cw(c7723.25,4642.48) v2@7701.52,4642.48 ; v2(7692.52,4642.48) 7712.2,4622.8 ; 7706.2,4347.2 cw(c7691.72,4347.2) 7701.96,4336.96 cw(c7712.2,4326.72) 7712.2,4341.2 ; 7706.2,4622.8 ccw(c7691.72,4622.8) 7701.96,4633.04 ccw(c7712.2,4643.28) 7712.2,4628.8 ; v2(7731.89,4327.52) 7751.58,4347.2 ; v2@7731.89,4336.52 ccw(c7731.89,4358.25) 7747.25,4342.88 ccw(c7762.62,4327.52) v2@7740.89,4327.52 ; v2@7731.89,4633.48 cw(c7731.89,4611.75) 7747.25,4627.12 cw(c7762.62,4642.48) v2@7740.89,4642.48 ; v2(7731.89,4642.48) 7751.58,4622.8 ; 7745.58,4347.2 cw(c7731.09,4347.2) 7741.33,4336.96 cw(c7751.58,4326.72) 7751.58,4341.2 ; 7745.58,4622.8 ccw(c7731.09,4622.8) 7741.33,4633.04 ccw(c7751.58,4643.28) 7751.58,4628.8 ; v2(7771.26,4327.52) 7790.95,4347.2 ; v2@7771.26,4336.52 ccw(c7771.26,4358.25) 7786.62,4342.88 ccw(c7801.99,4327.52) v2@7780.26,4327.52 ; 7784.95,4347.2 cw(c7770.46,4347.2) 7780.7,4336.96 cw(c7790.95,4326.72) 7790.95,4341.2 ; v2@7810.63,4633.48 cw(c7810.63,4611.75) 7825.99,4627.12 cw(c7841.36,4642.48) v2@7819.63,4642.48 ; v2(7810.63,4642.48) 7830.32,4622.8 ; 7824.32,4622.8 ccw(c7809.83,4622.8) 7820.07,4633.04 ccw(c7830.32,4643.28) 7830.32,4628.8 ; 7869.69,4622.8 v2(7889.37,4642.48) ; 7869.69,4628.8 ccw(c7869.69,4643.28) 7879.93,4633.04 ccw(c7890.17,4622.8) 7875.69,4622.8 ; v2@7880.37,4642.48 cw(c7858.64,4642.48) 7874.01,4627.12 cw(c7889.37,4611.75) v2@7889.37,4633.48 ; 7909.06,4622.8 v2(7928.74,4642.48) ; 7909.06,4628.8 ccw(c7909.06,4643.28) 7919.3,4633.04 ccw(c7929.54,4622.8) 7915.06,4622.8 ; v2@7919.74,4642.48 cw(c7898.01,4642.48) 7913.38,4627.12 cw(c7928.74,4611.75) v2@7928.74,4633.48 ; 7948.43,4504.69 v2(7968.11,4524.37) ; 7948.43,4510.69 ccw(c7948.43,4525.17) 7958.67,4514.93 ccw(c7968.91,4504.69) 7954.43,4504.69 ; 7948.43,4622.8 v2(7968.11,4642.48) ; 7948.43,4628.8 ccw(c7948.43,4643.28) 7958.67,4633.04 ccw(c7968.91,4622.8) 7954.43,4622.8 ; v2@7959.11,4524.37 cw(c7937.38,4524.37) 7952.75,4509.01 cw(c7968.11,4493.64) v2@7968.11,4515.37 ; v2@7959.11,4642.48 cw(c7937.38,4642.48) 7952.75,4627.12 cw(c7968.11,4611.75) v2@7968.11,4633.48 ; 7987.8,4341.2 cw(c7987.8,4326.72) 7998.04,4336.96 cw(c8008.28,4347.2) 7993.8,4347.2 ; 7987.8,4347.2 v2(8007.48,4327.52) ; 7987.8,4622.8 v2(8007.48,4642.48) ; 7987.8,4628.8 ccw(c7987.8,4643.28) 7998.04,4633.04 ccw(c8008.28,4622.8) 7993.8,4622.8 ; v2@7998.48,4327.52 ccw(c7976.75,4327.52) 7992.12,4342.88 ccw(c8007.48,4358.25) v2@8007.48,4336.52 ; v2@7998.48,4642.48 cw(c7976.75,4642.48) 7992.12,4627.12 cw(c8007.48,4611.75) v2@8007.48,4633.48
  MidLayer1 w4: 4870,3859.53 4918.62,3859.53 4938.04,3859.53 4998.23,3859.53 5002.99,3859.53 ccw(c5003.16,3892.66) 5020.81,3864.62 ; 4870,3875.04 4918.62,3875.04 4938.04,3875.04 v3(4996.3,3875.04) ; 4870,3914.41 4918.62,3914.41 4938.04,3914.41 v3(4996.3,3914.41) ; v3@4991.11,3869.85 ccw(c4978.57,3857.31) 4978.57,3875.04 ccw(c4978.57,3892.77) v3@4991.11,3880.23 ; v3@4991.11,3909.22 ccw(c4978.57,3896.68) 4978.57,3914.41 ccw(c4978.57,3932.14) v3@4991.11,3919.6 ; v3@5028.28,3876.34 cw(c5010.45,3879.49) 5020.84,3864.65 cw(c5031.22,3849.82) v3@5034.37,3867.65 ; v3@5030.48,3791.11 cw(c5017.94,3778.57) 5035.67,3778.57 cw(c5053.4,3778.57) v3@5040.86,3791.11 ; v3@5030.48,4588.89 ccw(c5017.94,4601.43) 5035.67,4601.43 ccw(c5053.4,4601.43) v3@5040.86,4588.89 ; 5035.67,3670 5035.67,3718.62 5035.67,3738.04 v3(5035.67,3796.3) ; v3(5035.67,4583.7) 5035.67,4641.96 5035.67,4661.38 5035.67,4710 ; 5059.53,4710 5059.53,4661.38 5059.53,4577.01 ccw(c5092.66,4576.84) 5064.62,4559.19 ; v3@5067.65,4545.63 ccw(c5049.82,4548.78) 5064.65,4559.16 ccw(c5079.49,4569.55) v3@5076.34,4551.72 ; 5129.92,3670 5129.92,3718.62 5129.92,3738.04 5129.92,3812.16 ; 5129.92,3798.23 5129.92,3812.16 ; v3@5146.31,3874.39 cw(c5128.27,3872.81) 5142.14,3861.17 ; v3@5154.43,3867.57 ccw(c5156.01,3849.53) 5142.14,3861.17 ; 5169.29,4581.77 5169.29,4567.84 ; 5169.29,4710 5169.29,4661.38 5169.29,4641.96 5169.29,4567.84 ; 5177.64,4710 5177.64,4661.38 5177.64,4567.84 ccw(c5191.69,4567.84) 5181.76,4557.91 ; v3@5185.68,4505.61 ccw(c5167.64,4507.19) 5181.51,4518.83 ; v3@5185.68,4544.98 ccw(c5167.64,4546.56) 5181.51,4558.2 ccw(c5195.38,4569.84) v3@5193.8,4551.8 ; v3@5193.8,4512.43 cw(c5195.38,4530.47) 5181.51,4518.83 ; 5208.66,4581.77 5208.66,4567.84 ; 5208.66,4710 5208.66,4661.38 5208.66,4641.96 5208.66,4567.84 ; v3@5225.05,4505.61 ccw(c5207.01,4507.19) 5220.88,4518.83 ; v3@5233.17,4512.43 cw(c5234.75,4530.47) 5220.88,4518.83 ; 5256.38,4710 5256.38,4661.38 5256.38,4641.96 5256.38,4581.77 5256.38,4567.84 ccw(c5270.43,4567.84) 5260.5,4557.91 ; v3@5264.42,4544.98 ccw(c5246.38,4546.56) 5260.25,4558.2 ccw(c5274.12,4569.84) v3@5272.54,4551.8 ; 5295.75,4581.77 5295.75,4567.84 ; 5295.75,4720 5295.75,4710 5295.75,4661.38 5295.75,4567.84 ; 5299.87,4557.91 cw(c5309.8,4567.84) 5295.75,4567.84 ; v3@5303.79,4544.98 ccw(c5285.75,4546.56) 5299.62,4558.2 ccw(c5313.49,4569.84) v3@5311.91,4551.8 ; v3@5305.96,4589 ccw(c5293.15,4601.81) 5311.26,4601.81 ccw(c5329.37,4601.81) v3@5316.56,4589 ; v3@5306.07,4588.89 ccw(c5293.53,4601.43) 5311.26,4601.43 ccw(c5328.99,4601.43) v3@5316.45,4588.89 ; v3(5311.26,4583.7) 5311.26,4710 ; v3@5424.18,4588.89 ccw(c5411.64,4601.43) 5429.37,4601.43 ccw(c5447.1,4601.43) v3@5434.56,4588.89 ; v3(5429.37,4583.7) 5429.37,4661.38 5429.37,4710 ; v3@5463.44,4589 ccw(c5450.63,4601.81) 5468.74,4601.81 ccw(c5486.85,4601.81) v3@5474.04,4589 ; v3@5463.55,4588.89 ccw(c5451.01,4601.43) 5468.74,4601.43 ccw(c5486.47,4601.43) v3@5473.93,4588.89 ; v3(5468.74,4583.7) 5468.74,4710 ; v3@5586.2,4512.43 ccw(c5584.62,4530.47) 5598.49,4518.83 ; v3@5586.2,4551.8 ccw(c5584.62,4569.84) 5598.49,4558.2 ccw(c5612.36,4546.56) v3@5594.32,4544.98 ; v3@5594.32,4505.61 cw(c5612.36,4507.19) 5598.49,4518.83 ; 5598.24,4557.91 ccw(c5588.31,4567.84) 5602.36,4567.84 5602.36,4661.38 5602.36,4710 ; 5610.71,4581.77 5610.71,4567.84 ; 5610.71,4710 5610.71,4661.38 5610.71,4641.96 5610.71,4567.84 ; v3@5620.92,4589 ccw(c5608.11,4601.81) 5626.22,4601.81 ccw(c5644.33,4601.81) v3@5631.52,4589 ; v3@5621.03,4588.89 ccw(c5608.49,4601.43) 5626.22,4601.43 ccw(c5643.95,4601.43) v3@5631.41,4588.89 ; v3(5626.22,4583.7) 5626.22,4661.38 5626.22,4710 ; v3@5664.94,4551.8 ccw(c5663.36,4569.84) 5677.23,4558.2 ccw(c5691.1,4546.56) v3@5673.06,4544.98 ; 5676.99,4557.91 ccw(c5667.05,4567.84) 5681.1,4567.84 5681.1,4661.38 5681.1,4710 ; v3@5739.14,3791.11 cw(c5726.6,3778.57) 5744.33,3778.57 cw(c5762.06,3778.57) v3@5749.52,3791.11 ; 5744.33,3670 5744.33,3718.62 5744.33,3738.04 v3(5744.33,3796.3) ; v3(5783.7,4111.26) 5841.96,4111.26 5861.38,4111.26 5910,4111.26 ; v3(5783.7,4229.37) 5841.96,4229.37 5861.38,4229.37 5910,4229.37 ; v3(5783.7,4308.11) 5841.96,4308.11 5861.38,4308.11 5910,4308.11 ; v3(5783.7,4426.22) 5841.96,4426.22 5861.38,4426.22 5910,4426.22 ; v3@5788.89,4106.07 cw(c5801.43,4093.53) 5801.43,4111.26 cw(c5801.43,4128.99) v3@5788.89,4116.45 ; v3@5788.89,4224.18 cw(c5801.43,4211.64) 5801.43,4229.37 cw(c5801.43,4247.1) v3@5788.89,4234.56 ; v3@5788.89,4302.92 cw(c5801.43,4290.38) 5801.43,4308.11 cw(c5801.43,4325.84) v3@5788.89,4313.3 ; v3@5788.89,4421.03 cw(c5801.43,4408.49) 5801.43,4426.22 cw(c5801.43,4443.95) v3@5788.89,4431.41 ; v3@5789,4105.96 cw(c5801.81,4093.15) 5801.81,4111.26 cw(c5801.81,4129.37) v3@5789,4116.56 ; v3@5789,4302.81 cw(c5801.81,4290) 5801.81,4308.11 cw(c5801.81,4326.22) v3@5789,4313.41 ; v3@5789,4420.92 cw(c5801.81,4408.11) 5801.81,4426.22 cw(c5801.81,4444.33) v3@5789,4431.52 ; 4978.19,3875.04 ccw(c4978.19,3893.15) 4991,3880.34 cw(c4978.19,3893.15) 4978.19,3875.04 ; 4978.19,3875.04 cw(c4978.19,3856.93) 4991,3869.74 ccw(c4978.19,3856.93) 4978.19,3875.04 ; 4978.19,3914.41 cw(c4978.19,3896.3) 4991,3909.11 ccw(c4978.19,3896.3) 4978.19,3914.41 ; 4978.19,3914.41 ccw(c4978.19,3932.52) 4991,3919.71 cw(c4978.19,3932.52) 4978.19,3914.41 ; 5035.67,3778.19 cw(c5053.78,3778.19) 5040.97,3791 ccw(c5053.78,3778.19) 5035.67,3778.19 ; 5035.67,3778.19 ccw(c5017.56,3778.19) 5030.37,3791 cw(c5017.56,3778.19) 5035.67,3778.19 ; 5035.67,4601.81 ccw(c5053.78,4601.81) 5040.97,4589 cw(c5053.78,4601.81) 5035.67,4601.81 ; 5035.67,4601.81 cw(c5017.56,4601.81) 5030.37,4589 ccw(c5017.56,4601.81) 5035.67,4601.81 ; 5129.92,3812.16 5129.92,3831.66 cw(c5171.65,3831.66) 5142.14,3861.17 ; 5169.29,4567.84 5169.29,4548.34 ccw(c5211.02,4548.34) 5181.51,4518.83 ; 5208.66,4567.84 5208.66,4548.34 ccw(c5250.39,4548.34) 5220.88,4518.83 ; 5429.37,4601.81 cw(c5411.26,4601.81) 5424.07,4589 ccw(c5411.26,4601.81) 5429.37,4601.81 ; 5429.37,4601.81 ccw(c5447.48,4601.81) 5434.67,4589 cw(c5447.48,4601.81) 5429.37,4601.81 ; 5598.49,4518.83 ccw(c5568.98,4548.34) 5610.71,4548.34 5610.71,4567.84 ; 5744.33,3778.19 cw(c5762.44,3778.19) 5749.63,3791 ccw(c5762.44,3778.19) 5744.33,3778.19 ; 5744.33,3778.19 ccw(c5726.22,3778.19) 5739.03,3791 cw(c5726.22,3778.19) 5744.33,3778.19 ; 5801.81,4229.37 cw(c5801.81,4247.48) 5789,4234.67 ccw(c5801.81,4247.48) 5801.81,4229.37 ; 5801.81,4229.37 ccw(c5801.81,4211.26) 5789,4224.07 cw(c5801.81,4211.26) 5801.81,4229.37
  MidLayer2 w4: 5256.38,3670 5256.38,3797.36 5256.38,3890.9 ; 5256.38,3876.97 5256.38,3890.9 ; 5256.38,4503.03 5256.38,4489.1 ; 5256.38,4710 5256.38,4582.64 5256.38,4489.1 ; 5260.5,3900.83 ccw(c5270.43,3890.9) 5256.38,3890.9 ; 5260.5,4479.17 cw(c5270.43,4489.1) 5256.38,4489.1 ; v3@5264.42,3913.76 cw(c5246.38,3912.18) 5260.25,3900.54 cw(c5274.12,3888.9) v3@5272.54,3906.94 ; v3@5264.42,4466.24 ccw(c5246.38,4467.82) 5260.25,4479.46 ccw(c5274.12,4491.1) v3@5272.54,4473.06 ; 5326.77,4710 5326.77,4582.64 5326.77,4563.22 5326.77,4489.1 5326.77,4469.6 ccw(c5368.5,4469.6) 5338.99,4440.09 ; v3@5343.16,4426.87 ccw(c5325.12,4428.45) 5338.99,4440.09 ; v3@5351.28,4433.69 cw(c5352.86,4451.73) 5338.99,4440.09 ; v3@5428.72,4473.06 ccw(c5427.14,4491.1) 5441.01,4479.46 ccw(c5454.88,4467.82) v3@5436.84,4466.24 ; 5440.76,4479.17 ccw(c5430.83,4489.1) 5444.88,4489.1 5444.88,4582.64 5444.88,4710 ; v3@5507.46,3906.94 cw(c5505.88,3888.9) 5519.75,3900.54 cw(c5533.62,3912.18) v3@5515.58,3913.76 ; v3@5507.46,4473.06 ccw(c5505.88,4491.1) 5519.75,4479.46 ccw(c5533.62,4467.82) v3@5515.58,4466.24 ; 5519.5,3900.83 cw(c5509.57,3890.9) 5523.62,3890.9 ; 5519.5,4479.17 ccw(c5509.57,4489.1) 5523.62,4489.1 ; 5523.62,3670 5523.62,3797.36 5523.62,3890.9 ; 5523.62,3876.97 5523.62,3890.9 ; 5523.62,4503.03 5523.62,4489.1 ; 5523.62,4710 5523.62,4582.64 5523.62,4489.1 ; v3@5585.55,3946.39 cw(c5582.4,3928.56) 5597.24,3938.95 ; v3@5585.55,4433.61 ccw(c5582.4,4451.44) 5597.24,4441.05 ; v3@5586.2,3906.94 cw(c5584.62,3888.9) 5598.49,3900.54 cw(c5612.36,3912.18) v3@5594.32,3913.76 ; v3@5586.2,4473.06 ccw(c5584.62,4491.1) 5598.49,4479.46 ccw(c5612.36,4467.82) v3@5594.32,4466.24 ; v3@5594.24,3952.48 ccw(c5612.07,3949.33) 5597.24,3938.95 ; v3@5594.24,4427.52 cw(c5612.07,4430.67) 5597.24,4441.05 ; 5598.24,3900.83 cw(c5588.31,3890.9) 5602.36,3890.9 ; 5598.24,4479.17 ccw(c5588.31,4489.1) 5602.36,4489.1 ; 5602.36,3670 5602.36,3797.36 5602.36,3890.9 ; 5602.36,3876.97 5602.36,3890.9 ; 5602.36,4503.03 5602.36,4489.1 ; 5602.36,4710 5602.36,4582.64 5602.36,4489.1 ; 5610.71,3670 5610.71,3739.1 ; 5610.71,3680.84 5610.71,3739.1 ; 5610.71,4699.16 5610.71,4640.9 ; 5610.71,4710 5610.71,4640.9 ; 5597.24,3938.95 5604.32,3930.37 cw(c5586.94,3914.15) 5610.71,3914.15 5610.71,3890.9 5610.71,3816.78 5610.71,3797.36 5610.71,3739.1 ; 5597.24,4441.05 5604.32,4449.63 ccw(c5586.94,4465.85) 5610.71,4465.85 5610.71,4489.1 5610.71,4563.22 5610.71,4582.64 5610.71,4640.9
  Bottom Layer w4: 5051.27,3670 5051.27,3679.78 5051.27,3738.04 5051.27,3796.3 cw(c5075.04,3796.3) 5075.04,3820.07 ccw(c5075.04,3835.67) 5090.64,3835.67 cw(c5114.41,3835.67) 5114.41,3859.44 ccw(c5114.41,3875.04) 5130.01,3875.04 cw(c5153.78,3875.04) 5136.97,3891.85 5143.39,3899.58 ; v3@5146.39,3913.11 cw(c5128.56,3909.96) 5143.39,3899.58 ; v3@5155.08,3907.02 ccw(c5158.23,3889.19) 5143.39,3899.58 ; 5217.01,4710 5217.01,4678.68 5217.01,4620.42 5217.01,4562.16 5217.01,4503.9 5217.01,4484.48 5217.01,4424.29 5217.01,4419.53 ccw(c5250.14,4419.36) 5222.1,4401.71 ; v3@5225.13,4388.15 ccw(c5207.3,4391.3) 5222.13,4401.68 ccw(c5236.97,4412.07) v3@5233.82,4394.24 ; 5335.12,4710 5335.12,4678.68 5335.12,4620.42 5335.12,4562.16 5335.12,4503.9 5335.12,4484.48 5335.12,4424.29 5335.12,4410.36 ccw(c5349.17,4410.36) 5339.24,4400.43 ; v3@5343.16,4387.5 ccw(c5325.12,4389.08) 5338.99,4400.72 ccw(c5352.86,4412.36) v3@5351.28,4394.32 ; v3@5468.09,4394.32 ccw(c5466.51,4412.36) 5480.38,4400.72 ccw(c5494.25,4389.08) v3@5476.21,4387.5 ; 5480.13,4400.43 ccw(c5470.2,4410.36) 5484.25,4410.36 5484.25,4424.29 5484.25,4484.48 5484.25,4503.9 5484.25,4562.16 5484.25,4620.42 5484.25,4678.68 5484.25,4710 ; v3@5546.18,4394.24 ccw(c5543.03,4412.07) 5557.87,4401.68 ccw(c5572.7,4391.3) v3@5554.87,4388.15 ; 5557.9,4401.71 ccw(c5529.86,4419.36) 5562.99,4419.53 5562.99,4424.29 5562.99,4484.48 5562.99,4503.9 5562.99,4562.16 5562.99,4620.42 5562.99,4678.68 5562.99,4710 ; v3@5624.92,3907.02 cw(c5621.77,3889.19) 5636.61,3899.58 ; v3@5633.61,3913.11 ccw(c5651.44,3909.96) 5636.61,3899.58 ; 5728.73,3670 5728.73,3679.78 5728.73,3738.04 5728.73,3796.3 ccw(c5704.96,3796.3) 5704.96,3820.07 cw(c5704.96,3835.67) 5689.36,3835.67 ccw(c5665.59,3835.67) 5665.59,3859.44 cw(c5665.59,3875.04) 5649.99,3875.04 ccw(c5626.22,3875.04) 5643.03,3891.85 5636.61,3899.58

## Polygon pours and split planes (outlines as drawn)
GND on Top Layer "TOP POLY POUR" (solid, remove dead copper, pour order 1012): 369 vertices, not listed, extent -923.8,-15.55 8603.76,6914.22
1V8 on Top Layer "Bottom Layer-No Net" (solid, remove dead copper, pour order 1002): 2567.37,1400 2070,1400 2070,2300 2074.45,2304.02 3120,2304.02 3120,1400
2V5 on Top Layer "Bottom Layer-No Net" (solid, remove dead copper, pour order 1001): 1482.37,1400 985,1400 985,2300 989.45,2304.02 2035,2304.02 2035,1400
3V3 on Top Layer "Bottom Layer-No Net" (solid, remove dead copper, pour order 1000): 397.37,1400 -100,1400 -100,2300 -95.55,2304.02 950,2304.02 950,1400
GND on MidLayer1 "Keep-Out Layer-No Net" (solid, remove dead copper, pour order 1013): 369 vertices, not listed, extent -923.8,-15.55 8603.76,6914.22
1V8 on MidLayer1 "Bottom Layer-No Net" (solid, remove dead copper, pour order 1005): 2567.37,1400 2070,1400 2070,2300 2074.45,2304.02 3120,2304.02 3120,1400
2V5 on MidLayer1 "Bottom Layer-No Net" (solid, remove dead copper, pour order 1004): 1482.37,1400 985,1400 985,2300 989.45,2304.02 2035,2304.02 2035,1400
3V3 on MidLayer1 "Bottom Layer-No Net" (solid, remove dead copper, pour order 1003): 397.37,1400 -100,1400 -100,2300 -95.55,2304.02 950,2304.02 950,1400
GND on MidLayer2 "Keep-Out Layer-No Net" (solid, remove dead copper, pour order 1014): 369 vertices, not listed, extent -923.8,-15.55 8603.76,6914.22
1V8 on MidLayer2 "Bottom Layer-No Net" (solid, remove dead copper, pour order 1008): 2567.37,1400 2070,1400 2070,2300 2074.45,2304.02 3120,2304.02 3120,1400
2V5 on MidLayer2 "Bottom Layer-No Net" (solid, remove dead copper, pour order 1007): 1482.37,1400 985,1400 985,2300 989.45,2304.02 2035,2304.02 2035,1400
3V3 on MidLayer2 "Bottom Layer-No Net" (solid, remove dead copper, pour order 1006): 397.37,1400 -100,1400 -100,2300 -95.55,2304.02 950,2304.02 950,1400
GND on Bottom Layer "Keep-Out Layer-No Net" (solid, remove dead copper, pour order 1015): 369 vertices, not listed, extent -923.8,-15.55 8603.76,6914.22
1V8 on Bottom Layer "Bottom Layer-No Net" (solid, remove dead copper, pour order 1011): 2567.37,1400 2070,1400 2070,2300 2074.45,2304.02 3120,2304.02 3120,1400
2V5 on Bottom Layer "Bottom Layer-No Net" (solid, remove dead copper, pour order 1010): 1482.37,1400 985,1400 985,2300 989.45,2304.02 2035,2304.02 2035,1400
3V3 on Bottom Layer "Bottom Layer-No Net" (solid, pour order 1009): 397.37,1400 -100,1400 -100,2300 -95.55,2304.02 950,2304.02 950,1400
no net on Top Overlay "PIN 1 Top Overlay" (solid, pour order 1000): 4875.48,4704.78 4844.59,4755.17 4825.09,4735.67
no net on Top Overlay "PIN 1 Top Overlay" (solid, pour order 1000): 5580.22,2305.48 5529.83,2274.59 5549.33,2255.09
no net on Top Overlay "PIN 1 Top Overlay" (solid, pour order 1000): 7409.78,2264.52 7460.17,2295.41 7440.67,2314.91
GND on GND+SHIELD (split plane): 1648 vertices, not listed, extent -525.07,83.3 8583.66,6669.97
SHIELD on GND+SHIELD (split plane): 1713 vertices, not listed, extent -903.7,4.55 7675.65,6894.13
1V2 on GND+SHIELD (split plane): 1264 vertices, not listed, extent 955.03,1326.29 7734.36,5073.71
AUGND on GND+SHIELD (split plane): 151 vertices, not listed, extent -521.1,3180.3 104.71,5764.7
2V5 on GND+SHIELD (split plane): 381 vertices, not listed, extent 740.09,1255 4119.97,3444.28
AUGND on GND+SHIELD (split plane): 80 vertices, not listed, extent -424.96,2235.04 219.96,2999.96
1V8 on GND+SHIELD (split plane): 204 vertices, not listed, extent 892.53,1435.03 2995.52,3162.48
AGND on GND+SHIELD (split plane): 112 vertices, not listed, extent 114.84,5202.44 1289.74,5930.69
AGND on GND+SHIELD (split plane): 112 vertices, not listed, extent 1560.87,5202.44 2735.82,5930.69
3V3 on P2 - 3V3+5V0 (split plane): 2549 vertices, not listed, extent -503.71,4.55 8583.66,6444.96
5V0 on P2 - 3V3+5V0 (split plane): 3290 vertices, not listed, extent -903.7,4.55 8583.66,6894.13
AUGND on P2 - 3V3+5V0 (split plane): 68 vertices, not listed, extent 21.5,4.55 2460.2,495.06
+B on P2 - 3V3+5V0 (split plane): 238 vertices, not listed, extent 6924.35,5223.81 7897.45,6444.96
GND on P2 - 3V3+5V0 (split plane): 893 vertices, not listed, extent 4925.73,3725.73 5854.27,4654.27
GND on P2 - 3V3+5V0 (split plane): 243 vertices, not listed, extent 6799.72,1733.46 7181.43,1996.54